# Altium PCB testpcb.PcbDoc
Units mil, origin at the board's own origin, x right, y up, seen from the top; angles counter-clockwise.
Board outline 6000 x 4000 mil, 4 copper layers (Top Layer, Layer 1, Layer 2, Bottom Layer), stack 23.756 mil thick; 151 components, 73 nets, 436 pads, 8 vias.
Unrouted connection lines stored in the file: 323.
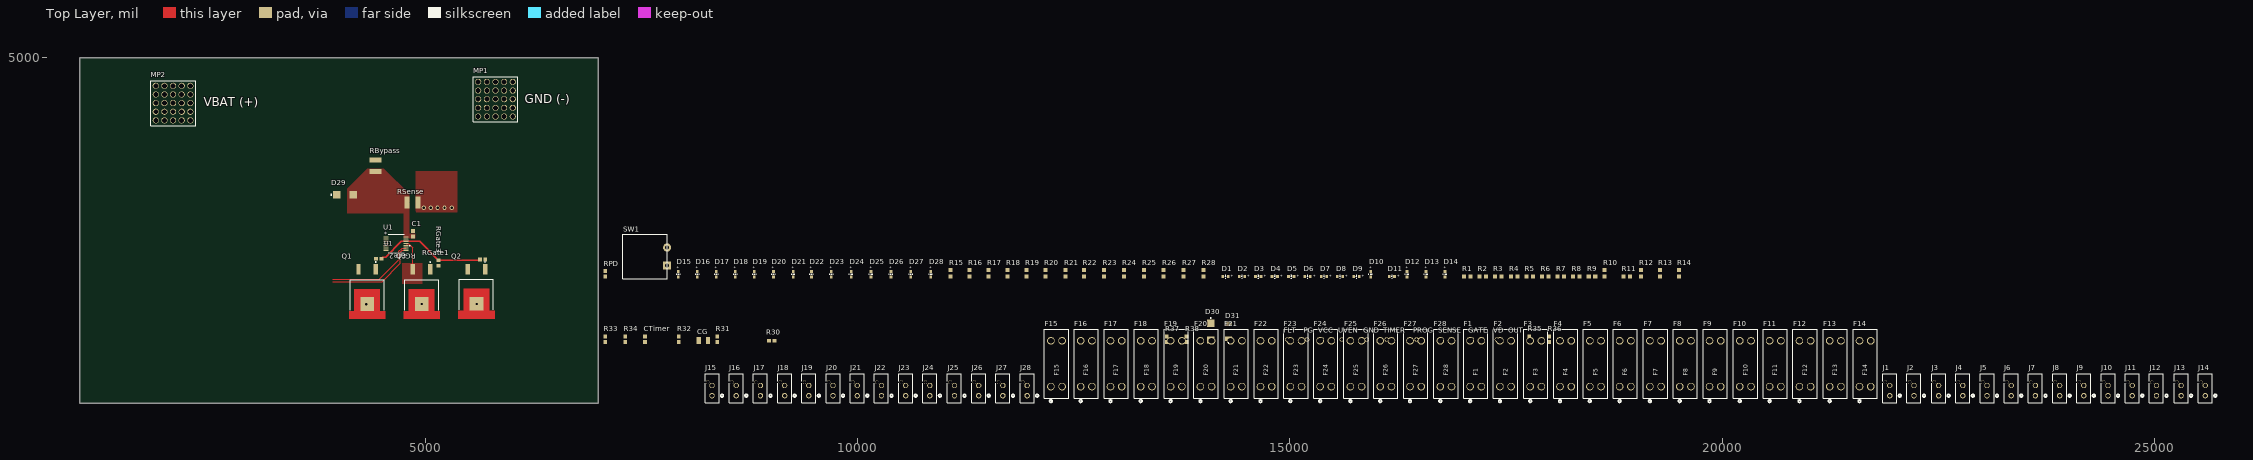
[diagram p0: Top Layer view]
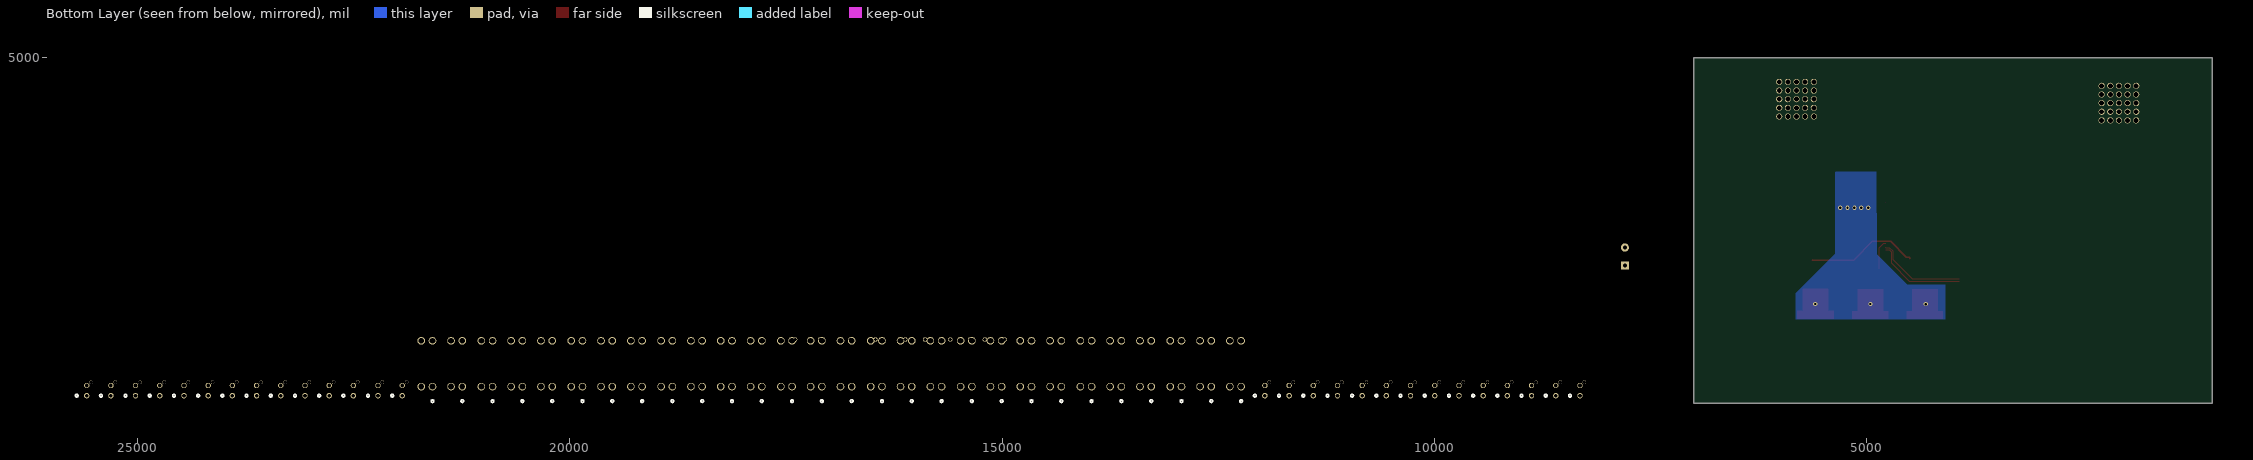
[diagram p1: Bottom Layer view, seen from below]

## Layer stack, top to bottom
Top Solder: solder mask 0.4, Solder Resist, Dk 3.5
Top Layer: signal copper 1.4
Dielectric 2: prepreg 2.8, PP-006, Dk 4.1
Layer 1: signal copper 1.378
Dielectric 1: dielectric 12.6, FR-4, Dk 4.8
Layer 2: signal copper 1.378
Dielectric 3: prepreg 2.8, PP-006, Dk 4.1
Bottom Layer: signal copper 1.4
Bottom Solder: solder mask 0.4, Solder Resist, Dk 3.5

## Board outline
1000,1000 7000,1000 7000,5000 1000,5000

## Design rules (kind name [scope] priority, off if disabled: settings)
Clearance [All] p1: gap=10 ignorepadtopadclearanceinfootprint=FALSE
PolygonConnect [All] p1: connectstyle=Direct reliefconductorwidth=10 reliefentries=4 polygonreliefangle="90 Angle" airgapwidth=10
RoutingVias [All] p1: holewidth=10 width=16 viastyle="Through Hole" minholewidth=10 minwidth=16 maxholewidth=28 maxwidth=50
SolderMaskExpansion [All] p1: expansion=4 istentingtop=FALSE
SupplyNets "Schematic Supply Nets_1" [InNet('GND')] p1: voltage=0.000
SupplyNets "Schematic Supply Nets" [InNet('VBAT')] p2: voltage=0.000
Width [All] p1: maxlimit=500 minlimit=10 preferedwidth=15 midlayer1_prefwidth=10 midlayer2_prefwidth=10 minimp=50.000000 maximp=50.000000 favimp=50.000000
30 further rules are at their usual default settings.

## Classes and differential pairs
component class "Status LEDs": D1 D2 D3 D4 D5 D6 D7 D8 D9 D10 D11 D12 D13 D14 D15 D16 D17 D18 D19 D20 D21 D22 D23 D24 D25 D26 D27 D28 R1 R2 R3 R4 R5 R6 R7 R8 R9 R10 R11 R12 R13 R14 R15 R16 R17 R18 R19 R20 R21 R22 R23 R24 R25 R26 R27 R28 RPD SW1
component class "Power Distribution": F1 F2 F3 F4 F5 F6 F7 F8 F9 F10 F11 F12 F13 F14 F15 F16 F17 F18 F19 F20 F21 F22 F23 F24 F25 F26 F27 F28 J1 J2 J3 J4 J5 J6 J7 J8 J9 J10 J11 J12 J13 J14 J15 J16 J17 J18 J19 J20 J21 J22 J23 J24 J25 J26 J27 J28 MP1 MP2
component class "Soft Start": C1 CG CTimer D29 D30 D31 FLT GATE GND OUT PG PROG Q1 Q2 Q3 R30 R31 R32 R33 R34 R35 R36 R37 R38 RBypass RGate1 RGate2 RGate3 RSense SENSE TIMER U1 UVEN VCC VD

## Components (designator, comment, footprint, x,y, rotation, side; value= is the part's Value field where it differs from the comment)
C1 "GRM1885C1H103JA01D" CAP-0603 4855,2965 r90 top
CG "CAP 1206" CAP-1206 8215,1730 r0 top
CTimer "CAP 0603" CAP-0603 7540,1745 r90 top
D1 "150060GS75000" WL-SMCW_0603 14255,2470 r0 top
D2 "150060GS75000" WL-SMCW_0603 14445,2470 r0 top
D3 "150060GS75000" WL-SMCW_0603 14635,2470 r0 top
D4 "150060GS75000" WL-SMCW_0603 14825,2470 r0 top
D5 "150060GS75000" WL-SMCW_0603 15015,2470 r0 top
D6 "150060GS75000" WL-SMCW_0603 15205,2470 r0 top
D7 "150060GS75000" WL-SMCW_0603 15395,2470 r0 top
D8 "150060GS75000" WL-SMCW_0603 15580,2470 r0 top
D9 "150060GS75000" WL-SMCW_0603 15770,2470 r0 top
D10 "150060GS75000" WL-SMCW_0603 15935,2495 r90 top
D11 "150060GS75000" WL-SMCW_0603 16180,2470 r0 top
D12 "150060GS75000" WL-SMCW_0603 16355,2495 r90 top
D13 "150060GS75000" WL-SMCW_0603 16575,2495 r90 top
D14 "150060GS75000" WL-SMCW_0603 16795,2495 r90 top
D15 "150060GS75000" WL-SMCW_0603 7925,2495 r90 top
D16 "150060GS75000" WL-SMCW_0603 8145,2495 r90 top
D17 "150060GS75000" WL-SMCW_0603 8365,2495 r90 top
D18 "150060GS75000" WL-SMCW_0603 8585,2495 r90 top
D19 "150060GS75000" WL-SMCW_0603 8805,2495 r90 top
D20 "150060GS75000" WL-SMCW_0603 9025,2495 r90 top
D21 "150060GS75000" WL-SMCW_0603 9255,2495 r90 top
D22 "150060GS75000" WL-SMCW_0603 9465,2495 r90 top
D23 "150060GS75000" WL-SMCW_0603 9695,2495 r90 top
D24 "150060GS75000" WL-SMCW_0603 9925,2495 r90 top
D25 "150060GS75000" WL-SMCW_0603 10155,2495 r90 top
D26 "150060GS75000" WL-SMCW_0603 10385,2495 r90 top
D27 "150060GS75000" WL-SMCW_0603 10615,2495 r90 top
D28 "150060GS75000" WL-SMCW_0603 10845,2495 r90 top
D29 "SMBJ40CA" "DO-214AA (SMBJ)" 4070,3415 r180 top
D30 "SMBJ40CA" "DO-214AA (SMBJ)" 14085,1830 r90 top
D31 "PMEG6030EP,115" DIO-SOD128 14290,1835 r0 top
F1 "36-3557-2-ND" CONN_3557-2_KEY 17085,1195 r90 top
F2 "36-3557-2-ND" CONN_3557-2_KEY 17430,1195 r90 top
F3 "36-3557-2-ND" CONN_3557-2_KEY 17780,1195 r90 top
F4 "36-3557-2-ND" CONN_3557-2_KEY 18125,1195 r90 top
F5 "36-3557-2-ND" CONN_3557-2_KEY 18470,1195 r90 top
F6 "36-3557-2-ND" CONN_3557-2_KEY 18815,1195 r90 top
F7 "36-3557-2-ND" CONN_3557-2_KEY 19165,1195 r90 top
F8 "36-3557-2-ND" CONN_3557-2_KEY 19510,1195 r90 top
F9 "36-3557-2-ND" CONN_3557-2_KEY 19855,1195 r90 top
F10 "36-3557-2-ND" CONN_3557-2_KEY 20205,1195 r90 top
F11 "36-3557-2-ND" CONN_3557-2_KEY 20550,1195 r90 top
F12 "36-3557-2-ND" CONN_3557-2_KEY 20895,1195 r90 top
F13 "36-3557-2-ND" CONN_3557-2_KEY 21245,1195 r90 top
F14 "36-3557-2-ND" CONN_3557-2_KEY 21590,1195 r90 top
F15 "36-3557-2-ND" CONN_3557-2_KEY 12235,1195 r90 top
F16 "36-3557-2-ND" CONN_3557-2_KEY 12580,1195 r90 top
F17 "36-3557-2-ND" CONN_3557-2_KEY 12925,1195 r90 top
F18 "36-3557-2-ND" CONN_3557-2_KEY 13275,1195 r90 top
F19 "36-3557-2-ND" CONN_3557-2_KEY 13620,1195 r90 top
F20 "36-3557-2-ND" CONN_3557-2_KEY 13965,1195 r90 top
F21 "36-3557-2-ND" CONN_3557-2_KEY 14315,1195 r90 top
F22 "36-3557-2-ND" CONN_3557-2_KEY 14660,1195 r90 top
F23 "36-3557-2-ND" CONN_3557-2_KEY 15005,1195 r90 top
F24 "36-3557-2-ND" CONN_3557-2_KEY 15350,1195 r90 top
F25 "36-3557-2-ND" CONN_3557-2_KEY 15700,1195 r90 top
F26 "36-3557-2-ND" CONN_3557-2_KEY 16045,1195 r90 top
F27 "36-3557-2-ND" CONN_3557-2_KEY 16390,1195 r90 top
F28 "36-3557-2-ND" CONN_3557-2_KEY 16740,1195 r90 top
FLT "5003" TEST-POINT-0001 14970,1740 r0 top
GATE "5003" TEST-POINT-0001 17105,1740 r90 top
GND "5003" TEST-POINT-0001 15890,1740 r0 top
J1 "CONN MF+ 2 PIN VERT" CONN_2068320000-SD_02_MOL 21940,1090 r0 top
J2 "CONN MF+ 2 PIN VERT" CONN_2068320000-SD_02_MOL 22220,1090 r0 top
J3 "CONN MF+ 2 PIN VERT" CONN_2068320000-SD_02_MOL 22505,1090 r0 top
J4 "CONN MF+ 2 PIN VERT" CONN_2068320000-SD_02_MOL 22785,1090 r0 top
J5 "CONN MF+ 2 PIN VERT" CONN_2068320000-SD_02_MOL 23065,1090 r0 top
J6 "CONN MF+ 2 PIN VERT" CONN_2068320000-SD_02_MOL 23345,1090 r0 top
J7 "CONN MF+ 2 PIN VERT" CONN_2068320000-SD_02_MOL 23625,1090 r0 top
J8 "CONN MF+ 2 PIN VERT" CONN_2068320000-SD_02_MOL 23905,1090 r0 top
J9 "CONN MF+ 2 PIN VERT" CONN_2068320000-SD_02_MOL 24185,1090 r0 top
J10 "CONN MF+ 2 PIN VERT" CONN_2068320000-SD_02_MOL 24465,1090 r0 top
J11 "CONN MF+ 2 PIN VERT" CONN_2068320000-SD_02_MOL 24745,1090 r0 top
J12 "CONN MF+ 2 PIN VERT" CONN_2068320000-SD_02_MOL 25025,1090 r0 top
J13 "CONN MF+ 2 PIN VERT" CONN_2068320000-SD_02_MOL 25310,1090 r0 top
J14 "CONN MF+ 2 PIN VERT" CONN_2068320000-SD_02_MOL 25590,1090 r0 top
J15 "CONN MF+ 2 PIN VERT" CONN_2068320000-SD_02_MOL 8315,1090 r0 top
J16 "CONN MF+ 2 PIN VERT" CONN_2068320000-SD_02_MOL 8595,1090 r0 top
J17 "CONN MF+ 2 PIN VERT" CONN_2068320000-SD_02_MOL 8875,1090 r0 top
J18 "CONN MF+ 2 PIN VERT" CONN_2068320000-SD_02_MOL 9155,1090 r0 top
J19 "CONN MF+ 2 PIN VERT" CONN_2068320000-SD_02_MOL 9435,1090 r0 top
J20 "CONN MF+ 2 PIN VERT" CONN_2068320000-SD_02_MOL 9715,1090 r0 top
J21 "CONN MF+ 2 PIN VERT" CONN_2068320000-SD_02_MOL 9995,1090 r0 top
J22 "CONN MF+ 2 PIN VERT" CONN_2068320000-SD_02_MOL 10275,1090 r0 top
J23 "CONN MF+ 2 PIN VERT" CONN_2068320000-SD_02_MOL 10555,1090 r0 top
J24 "CONN MF+ 2 PIN VERT" CONN_2068320000-SD_02_MOL 10835,1090 r0 top
J25 "CONN MF+ 2 PIN VERT" CONN_2068320000-SD_02_MOL 11120,1090 r0 top
J26 "CONN MF+ 2 PIN VERT" CONN_2068320000-SD_02_MOL 11400,1090 r0 top
J27 "CONN MF+ 2 PIN VERT" CONN_2068320000-SD_02_MOL 11680,1090 r0 top
J28 "CONN MF+ 2 PIN VERT" CONN_2068320000-SD_02_MOL 11960,1090 r0 top
MP1 "732-3278-ND" *WP-SHFU_7461098_HAL 5810,4520 r0 top
MP2 "732-3278-ND" *WP-SHFU_7461098_HAL 2080,4475 r0 top
OUT "5003" TEST-POINT-0001 17565,1740 r0 top
PG "5003" TEST-POINT-0001 15200,1740 r0 top
PROG "5003" TEST-POINT-0001 16465,1740 r90 top
Q1 "PSMN3R7-100BSEJ" TRANS_PSMN3R7-100BSEJ 4325,2300 r270 top
Q2 "PSMN3R7-100BSEJ" TRANS_PSMN3R7-100BSEJ 5590,2303.03 r270 top
Q3 "PSMN3R7-100BSEJ" TRANS_PSMN3R7-100BSEJ 4955,2300 r270 top
R1 "RA73F2A2K0BTD" RES-0805 17050,2470 r0 top
R2 "RA73F2A2K0BTD" RES-0805 17230,2470 r0 top
R3 "RA73F2A2K0BTD" RES-0805 17410,2470 r0 top
R4 "RA73F2A2K0BTD" RES-0805 17595,2470 r0 top
R5 "RA73F2A2K0BTD" RES-0805 17775,2470 r0 top
R6 "RA73F2A2K0BTD" RES-0805 17955,2470 r0 top
R7 "RA73F2A2K0BTD" RES-0805 18135,2470 r0 top
R8 "RA73F2A2K0BTD" RES-0805 18315,2470 r0 top
R9 "RA73F2A2K0BTD" RES-0805 18495,2470 r0 top
R10 "RA73F2A2K0BTD" RES-0805 18640,2505 r90 top
R11 "RA73F2A2K0BTD" RES-0805 18895,2470 r0 top
R12 "RA73F2A2K0BTD" RES-0805 19060,2505 r90 top
R13 "RA73F2A2K0BTD" RES-0805 19280,2505 r90 top
R14 "RA73F2A2K0BTD" RES-0805 19500,2505 r90 top
R15 "RA73F2A2K0BTD" RES-0805 11075,2505 r90 top
R16 "RA73F2A2K0BTD" RES-0805 11295,2505 r90 top
R17 "RA73F2A2K0BTD" RES-0805 11515,2505 r90 top
R18 "RA73F2A2K0BTD" RES-0805 11735,2505 r90 top
R19 "RA73F2A2K0BTD" RES-0805 11955,2505 r90 top
R20 "RA73F2A2K0BTD" RES-0805 12175,2505 r90 top
R21 "RA73F2A2K0BTD" RES-0805 12405,2505 r90 top
R22 "RA73F2A2K0BTD" RES-0805 12620,2505 r90 top
R23 "RA73F2A2K0BTD" RES-0805 12850,2505 r90 top
R24 "RA73F2A2K0BTD" RES-0805 13080,2505 r90 top
R25 "RA73F2A2K0BTD" RES-0805 13310,2505 r90 top
R26 "RA73F2A2K0BTD" RES-0805 13540,2505 r90 top
R27 "RA73F2A2K0BTD" RES-0805 13770,2505 r90 top
R28 "RA73F2A2K0BTD" RES-0805 14000,2505 r90 top
R30 "RES 0603" RES-0603 9005,1725 r0 top
R31 "RT0603DRD0710KL" RES-0603 8375,1745 r90 top
R32 "ERJ-3EKF4122V" RES-0603 7930,1745 r90 top
R33 "ERJ-3EKF2001V" RES-0603 7080,1745 r90 top
R34 "RES 0603" RES-0603 7310,1745 r90 top
R35 "RES 0603" RES-0603 17770,1745 r90 top
R36 "RES 0603" RES-0603 18000,1745 r90 top
R37 "RES 0603" RES-0603 13575,1745 r90 top
R38 "RES 0603" RES-0603 13805,1745 r90 top
RBypass "RES 2512" RES-2512 4420,3750 r90 top
RGate1 "CRCW060310R0FKEA" RES-0603 5660,2665 r180 top
RGate2 "CRCW060310R0FKEA" RES-0603 4460,2675 r0 top
RGate3 "CRCW060310R0FKEA" RES-0603 5150,2625 r90 top
RPD "RES 0603" RES-0603 7080,2500 r90 top
RSense "VMS-R010-1.0-U" RES-2512 4850.04,3325 r0 top
SENSE "5003" TEST-POINT-0001 16755,1740 r90 top
SW1 "GPTS203211B" BUTTON-0002 7540,2700 r0 top
TIMER "5003" TEST-POINT-0001 16120,1740 r90 top
U1 "IC-TPS2493PWR" PW14 4660,2850 r0 top
UVEN "5003" TEST-POINT-0001 15600,1740 r90 top
VCC "5003" TEST-POINT-0001 15370,1740 r0 top
VD "5003" TEST-POINT-0001 17395,1740 r0 top

## Footprints (in the part's own frame and the unit in brackets; to place one, negate y for a bottom-side part, rotate by r counter-clockwise, add the part's x,y. Pads: shape width x height; smd on the part's side, far side on the other; paste and mask are expansions set on the pad)
*WP-SHFU_7461098_HAL [mm]
  round 1.8 hole 1.45: 1(-5.08,5.08) 2(-2.54,5.08) 3(0,5.08) 4(2.54,5.08) 5(5.08,5.08) 6(5.08,2.54) 7(2.54,2.54) 8(0,2.54) 9(-2.54,2.54) 10(-5.08,2.54) 11(-5.08,0) 12(-2.54,0) 13(0,0) 14(2.54,0) 15(5.08,0) 16(5.08,-2.54) 17(2.54,-2.54) 18(0,-2.54) 19(-2.54,-2.54) 20(-5.08,-2.54) 21(-5.08,-5.08) 22(-2.54,-5.08) 23(0,-5.08) 24(2.54,-5.08) 25(5.08,-5.08)
  silkscreen extent -6.6,-6.6 6.6,6.6
BUTTON-0002 [mm]
  rect 2.4x2.4 hole 1.2: 1(6.5,-2.65)
  round 2.4 hole 1.2: 2(6.5,2.65)
  silkscreen extent -6.5,-6.5 6.5,6.5
CAP-0603 [mm]
  rect 1.15x1.1 smd: 1(-0.8,0) 2(0.8,0)
  body extent -0.8,-0.45 0.8,0.45, height 0.8
CAP-1206 [mm]
  rect 1.25x2 smd: 1(-1.375,0) 2(1.375,0)
  body extent -1.6,-0.8 1.6,0.8, height 1.5
CONN_3557-2_KEY [mil]
  round 88 hole 68 paste-99999 mask+0: 1_1(0,0) 1_2(0,-130) 2_1(530,0) 2_2(530,-130)
  silkscreen extent -182,-205 662,75
CONN_2068320000-SD_02_MOL [mil]
  round 62 / inner round 60 / far side round 62 hole 42 paste-99999 mask+0: 1(0,0) 2(0,118.11)
  round 40 / inner round 60 / far side round 40 hole 40 unplated paste-99999 mask+0: 3(-50.39,156.69)
  silkscreen extent -81,-81 131,254, body extent -76,-76 76,249, height 392
DIO-SOD128 [mm]
  rect 2x1.4 smd: 1(0,2.2) 2(0,-2.2)
  silkscreen extent -0.12,-3.55 0.13,-3.3, body extent -1.25,-2.35 1.25,2.35, height 1.05
"DO-214AA (SMBJ)" [mm]
  rect 2.16x2.26 smd: 1(-2.416,0) 2(2.484,0)
  silkscreen extent 3.94,-0.12 4.19,0.12, body extent -2.72,-1.95 2.78,1.95, height 2.45
PW14 [mil]
  rect 57.56x13.97 smd paste+0 mask+0: 1(-115,76.77) 2(-115,51.18) 3(-115,25.59) 4(-115,0) 5(-115,-25.59) 6(-115,-51.18) 7(-115,-76.77) 8(115,-76.77) 9(115,-51.18) 10(115,-25.59) 11(115,0) 12(115,25.59) 13(115,51.18) 14(115,76.77)
  silkscreen extent -94,-106 164,106, body extent -130,-101 130,101, height 47
RES-0603 [mm]
  rect 1.15x1.1 smd: 1(-0.8,0) 2(0.8,0)
  body extent -0.8,-0.4 0.8,0.4, height 0.43
RES-0805 [mm]
  rect 1.2x1.2 smd: 1(-0.95,0) 2(0.95,0)
  body extent -1,-0.6 1,0.6, height 0.71
RES-2512 [mm]
  rect 1.45x3.5 smd: 1(-1.65,0) 2(1.65,0)
TEST-POINT-0001 [mm] "2024 miniature test point"
  round 1.3 hole 1: 1(0,0)
  body extent -1.27,-1.27 1.27,1.27, height 4.57
TRANS_PSMN3R7-100BSEJ [mm]
  rect 3.1x1.3 smd paste-3: 1(-6.4,2.54) 3(-6.4,-2.54)
  rect 4x4 smd paste-3 mask+0: MB(3.8,0)
  Top Layer region: 8.15,-5.3 5.9,-5.3 5.9,-3.75 -0.55,-3.75 -0.55,3.75 5.9,3.75 5.9,5.3 8.15,5.3
  silkscreen extent -8.6,-5 5.58,5, body extent -7.65,-5 7.65,5, height 4.5
WL-SMCW_0603 [mm]
  rect 0.8x0.8 smd: 1(-0.8,0) 2(0.8,0)
  silkscreen extent -0.13,-0.5 0.11,0.5, body extent -0.84,-0.38 0.76,0.42, height 0.7

## Part data
C1: library part "CAP 0603", "10000 pF ±5% 50V Ceramic Capacitor C0G, NP0 0603 (1608 Metric)", Capacitance=0.1uF, Voltage Rating=50V
CG: "0.082 µF ±5% 50V Ceramic Capacitor C0G, NP0 1206 (3216 Metric)", Capacitance=0.082uF, Voltage Rating=50V
CTimer: "10000 pF ±5% 50V Ceramic Capacitor C0G, NP0 0603 (1608 Metric)", Capacitance=0.010uF, Voltage Rating=50V
D1 D2 D3 D4 D5 D6 D7 D8 D9 D10 D11 D12 D13 D14 D15 D16 D17 D18 D19 D20 D21 D22 D23 D24 D25 D26 D27 D28: library part LED-0002, "Green 520nm LED Indication - Discrete 3.2V 0603 (1608 Metric)", Current=20mA, Voltage=3.2V
D29 D30: library part DIO-TVS-0001, "TVS DIODE 40VWM 64.5VC DO214AA", Current Rating=9.3A, Voltage Rating=64.5V, ComponentLink1Description=Datasheet, ComponentLink1URL=https://www.littelfuse.com/media?resourcetype=datasheets&itemid=09a6ae9a-73cb-4ac4-acac-e6dab92ab953&filename=littelfuse_tvs_diode_smbj_datasheet.pdf
D31: library part DIO-SCHOTTKY-0003, "DIODE SCHOTTKY 60V 3A SOD128", Current Rating=3A, Reverse Voltage=60V, ComponentLink1Description=Datasheet, ComponentLink1URL=https://assets.nexperia.com/documents/data-sheet/PMEG6030EP.pdf
F1 F2 F3 F4 F5 F6 F7 F8 F9 F10 F11 F12 F13 F14 F15 F16 F17 F18 F19 F20 F21 F22 F23 F24 F25 F26 F27 F28: library part FUSE-0002, "Fuse Block 30 A 500V 1 Circuit Blade Through Hole / MINI ATO FUSE", Package="Nonstandard Keystone", Availability="In Stock", Check_prices=https://www.snapeda.com/parts/3557-2/Keystone+Electronics/view-part/?ref=eda, MF="Keystone Electronics", MP=3557-2, Price=None, Purchase-URL=https://pricing.snapeda.com/search/part/3557-2/?ref=eda, SnapEDA_Link=https://www.snapeda.com/parts/3557-2/Keystone+Electronics/view-part/?ref=snap
FLT GATE GND OUT PG PROG SENSE TIMER UVEN VCC VD: library part TEST-POINT-0001, "Oranange PC Test Point, Miniature Phoisphor Bronze Silver Plating Through Hole Mounting Type"
J1 J2 J3 J4 J5 J6 J7 J8 J9 J10 J11 J12 J13 J14 J15 J16 J17 J18 J19 J20 J21 J22 J23 J24 J25 J26 J27 J28: "Micro-Fit+ Vertical Header, Through Hole, 3.00mm Pitch, Dual Row, 2 Circuits, Tin (Sn) Plating, Glow-Wire Capable, Black, Tray", Manufacturer_Name="Molex Connector Corporation", Manufacturer_Part_Number=2068320201, Copyright="Copyright (C) 2025 Ultra Librarian. All rights reserved.", RefDes=RefDes, Type=Type
MP1 MP2: library part CONN-1POS-0002, "25 Pin Shank Terminal M6 Through Hole", Package=None, Availability=Unavailable, Check_prices=https://www.snapeda.com/parts/7461098/W%25C3%25BCrth+Elektronik+Midcom/view-part/?ref=eda, MF="WÃ¼rth Elektronik", MP=7461098, Price=None, SnapEDA_Link=https://www.snapeda.com/parts/7461098/W%25C3%25BCrth+Elektronik+Midcom/view-part/?ref=snap
Q1 Q2 Q3: "N-Channel 100 V 120A (Ta) 405W (Ta) Surface Mount D2PAK", Package="D2PAK-3 Nexperia USA Inc.", Check_prices=https://www.snapeda.com/parts/PSMN3R7-100BSEJ/Nexperia/view-part/?ref=eda, MF="Nexperia USA Inc.", MP=PSMN3R7-100BSEJ, SnapEDA_Link=https://www.snapeda.com/parts/PSMN3R7-100BSEJ/Nexperia/view-part/?ref=snap
R1 R2 R3 R4 R5 R6 R7 R8 R9 R10 R11 R12 R13 R14 R15 R16 R17 R18 R19 R20 R21 R22 R23 R24 R25 R26 R27 R28: library part RES-2K-0001, "2 kOhms ±0.1% 1W Chip Resistor 0805 (2012 Metric) Thin Film", Resistance=2K, Wattage="1 W"
R30: Resistance=210K, Wattage=1/10W
R31: library part "RES 0603", "10 kOhms ±0.5% 0.1W, 1/10W Chip Resistor 0603 (1608 Metric) Thin Film", Resistance=10K, Wattage=1/10W
R32: library part "RES 0603", "41.2 kOhms ±1% 0.1W, 1/10W Chip Resistor 0603 (1608 Metric) Automotive AEC-Q200 Thick Film", Resistance=41.2K, Wattage=1/10W
R33: library part "RES 0603", "4.99 kOhms ±0.1% 0.1W, 1/10W Chip Resistor 0603 (1608 Metric) Anti-Sulfur, Automotive AEC-Q200 Thin Film", Resistance=4.99K, Wattage=1/10W
R34: "1 kOhms ±0.1% 0.1W, 1/10W Chip Resistor 0603 (1608 Metric) Anti-Sulfur, Automotive AEC-Q200 Thin Film", Resistance=1K, Wattage=1/10W
R35 R36: Resistance=470k, Wattage=1/10W
R37 R38: Resistance=100k, Wattage=1/10W
RBypass: "2 mOhms ±1% 3W Chip Resistor 2512 (6332 Metric) Automotive AEC-Q200, Current Sense, Moisture Resistant Metal Element", Resistance=0.002R, Wattage=3W
RGate1 RGate2 RGate3: library part "RES 0603", "10 Ohms ±1% 0.1W, 1/10W Chip Resistor 0603 (1608 Metric) Automotive AEC-Q200 Thick Film", Resistance=10R, Wattage=1/10W
RPD: Resistance=1M, Wattage=1/10W
RSense: library part "RES 2512", "2 mOhms ±1% 3W Chip Resistor 2512 (6332 Metric) Automotive AEC-Q200, Current Sense, Moisture Resistant Metal Element", Resistance=0.002R, Wattage=3W
SW1: library part BUTTON-0002, "Pushbutton Switch SPST Standard Through Hole", Current=1A, Voltage=30V
U1: "9-V to 80-V hot swap controller with power limiting, Auto Retry and analog current monitor 14-TSSOP -40 to 125", Manufacturer_Name="Texas Instruments", Manufacturer_Part_Number=TPS2493PWR, Copyright="Copyright (C) 2026 Ultra Librarian. All rights reserved.", RefDes=RefDes, Type=Type

## Via types
v1: diameter 50, hole 28, Top Layer to Bottom Layer, 8 vias

## Nets (pads, with @x,y where several pads share a name; then routed paths per layer and width w, separated by ;. In a path a pad name is that pad's centre, name@x,y a point inside that pad or via, vN(x,y) a via of type N, cw(c..) or ccw(c..) an arc to the next point about the centre after c; other vN are vias at no path point)
GATE: CG.1 GATE.1 RGate1.2 RGate2.2 RGate3.2 U1.12 | length 1314.9
  Top Layer w15: RGate2.2 4508.15,2691.65 4538.21,2691.65 4722.15,2875.59 U1.12 4931.89,2875.59 5150,2657.48 RGate3.2 5620,2656.5 RGate1.2
GND: C1.2 CTimer.2 D29.2 D30.2 D31.1 GND.1 J1.1 J2.1 J3.1 J4.1 J5.1 J6.1 J7.1 J8.1 J9.1 J10.1 J11.1 J12.1 J13.1 J14.1 J15.1 J16.1 J17.1 J18.1 J19.1 J20.1 J21.1 J22.1 J23.1 J24.1 J25.1 J26.1 J27.1 J28.1 MP1.1 MP1.2 MP1.3 MP1.4 MP1.5 MP1.6 MP1.7 MP1.8 MP1.9 MP1.10 MP1.11 MP1.12 MP1.13 MP1.14 MP1.15 MP1.16 MP1.17 MP1.18 MP1.19 MP1.20 MP1.21 MP1.22 MP1.23 MP1.24 MP1.25 R31.2 R33.2 R34.1 R37.1 R38.1 RPD.1 SW1.1 U1.5 U1.7
NetCG_2: CG.2 R34.2
NetD1_1: D1.1 R1.2
NetD1_2: D1.2 D2.2 D3.2 D4.2 D5.2 D6.2 D7.2 D8.2 D9.2 D10.2 D11.2 D12.2 D13.2 D14.2 D15.2 D16.2 D17.2 D18.2 D19.2 D20.2 D21.2 D22.2 D23.2 D24.2 D25.2 D26.2 D27.2 D28.2 RPD.2 SW1.2
NetD2_1: D2.1 R2.2
NetD3_1: D3.1 R3.2
NetD4_1: D4.1 R4.2
NetD5_1: D5.1 R5.2
NetD6_1: D6.1 R6.2
NetD7_1: D7.1 R7.2
NetD8_1: D8.1 R8.2
NetD9_1: D9.1 R9.2
NetD10_1: D10.1 R10.2
NetD11_1: D11.1 R11.2
NetD12_1: D12.1 R12.2
NetD13_1: D13.1 R13.2
NetD14_1: D14.1 R14.2
NetD15_1: D15.1 R15.2
NetD16_1: D16.1 R16.2
NetD17_1: D17.1 R17.2
NetD18_1: D18.1 R18.2
NetD19_1: D19.1 R19.2
NetD20_1: D20.1 R20.2
NetD21_1: D21.1 R21.2
NetD22_1: D22.1 R22.2
NetD23_1: D23.1 R23.2
NetD24_1: D24.1 R24.2
NetD25_1: D25.1 R25.2
NetD26_1: D26.1 R26.2
NetD27_1: D27.1 R27.2
NetD28_1: D28.1 R28.2
NetF1_1_1: F1.1_1 F1.1_2 J1.2 R1.1
NetF2_1_1: F2.1_1 F2.1_2 J2.2 R2.1
NetF3_1_1: F3.1_1 F3.1_2 J3.2 R3.1
NetF4_1_1: F4.1_1 F4.1_2 J4.2 R4.1
NetF5_1_1: F5.1_1 F5.1_2 J5.2 R5.1
NetF6_1_1: F6.1_1 F6.1_2 J6.2 R6.1
NetF7_1_1: F7.1_1 F7.1_2 J7.2 R7.1
NetF8_1_1: F8.1_1 F8.1_2 J8.2 R8.1
NetF9_1_1: F9.1_1 F9.1_2 J9.2 R9.1
NetF10_1_1: F10.1_1 F10.1_2 J10.2 R10.1
NetF11_1_1: F11.1_1 F11.1_2 J11.2 R11.1
NetF12_1_1: F12.1_1 F12.1_2 J12.2 R12.1
NetF13_1_1: F13.1_1 F13.1_2 J13.2 R13.1
NetF14_1_1: F14.1_1 F14.1_2 J14.2 R14.1
NetF15_2_1: F15.2_1 F15.2_2 J15.2 R15.1
NetF16_2_1: F16.2_1 F16.2_2 J16.2 R16.1
NetF17_2_1: F17.2_1 F17.2_2 J17.2 R17.1
NetF18_2_1: F18.2_1 F18.2_2 J18.2 R18.1
NetF19_2_1: F19.2_1 F19.2_2 J19.2 R19.1
NetF20_2_1: F20.2_1 F20.2_2 J20.2 R20.1
NetF21_2_1: F21.2_1 F21.2_2 J21.2 R21.1
NetF22_2_1: F22.2_1 F22.2_2 J22.2 R22.1
NetF23_2_1: F23.2_1 F23.2_2 J23.2 R23.1
NetF24_2_1: F24.2_1 F24.2_2 J24.2 R24.1
NetF25_2_1: F25.2_1 F25.2_2 J25.2 R25.1
NetF26_2_1: F26.2_1 F26.2_2 J26.2 R26.1
NetF27_2_1: F27.2_1 F27.2_2 J27.2 R27.1
NetF28_2_1: F28.2_1 F28.2_2 J28.2 R28.1
NetQ1_1: Q1.1 RGate2.1
NetQ2_1: Q2.1 RGate1.1
NetQ3_1: Q3.1 RGate3.1
NetU1_6: U1.6 U1.10
PROG: PROG.1 R32.2 R33.1 U1.3
SENSE: Q1.MB Q2.MB Q3.MB RSense.2 SENSE.1 U1.13 VD.1
  other v1: 4315,2150 4955,2150.39 5595,2150.39 4980,3265 5060,3265 5140,3265 5220,3265 5305,3265
TIMER: CTimer.1 TIMER.1 U1.4
UVEN: R30.1 R31.1 U1.1 UVEN.1
VBAT: C1.1 D29.1 F21.1_1 F21.1_2 F22.1_1 F22.1_2 F23.1_1 F23.1_2 F24.1_1 F24.1_2 F25.1_1 F25.1_2 F26.1_1 F26.1_2 F27.1_1 F27.1_2 F28.1_1 F28.1_2 MP2.1 MP2.2 MP2.3 MP2.4 MP2.5 MP2.6 MP2.7 MP2.8 MP2.9 MP2.10 MP2.11 MP2.12 MP2.13 MP2.14 MP2.15 MP2.16 MP2.17 MP2.18 MP2.19 MP2.20 MP2.21 MP2.22 MP2.23 MP2.24 MP2.25 R30.2 R35.2 R36.2 RBypass.1 RSense.1 U1.14 VCC.1 | length 0.1
  Top Layer w10: RSense.1@4785.04,3324.96 RSense.1
VREF: R32.1 U1.2
VS: D30.1 D31.2 F1.2_1 F1.2_2 F2.2_1 F2.2_2 F3.2_1 F3.2_2 F4.2_1 F4.2_2 F5.2_1 F5.2_2 F6.2_1 F6.2_2 F7.2_1 F7.2_2 F8.2_1 F8.2_2 F9.2_1 F9.2_2 F10.2_1 F10.2_2 F11.2_1 F11.2_2 F12.2_1 F12.2_2 F13.2_1 F13.2_2 F14.2_1 F14.2_2 F15.1_1 F15.1_2 F16.1_1 F16.1_2 F17.1_1 F17.1_2 F18.1_1 F18.1_2 F19.1_1 F19.1_2 F20.1_1 F20.1_2 OUT.1 Q1.3 Q2.3 Q3.3 RBypass.2 U1.11 | length 349.6
  Top Layer w10: U1.11 4776.98,2848.02 4808.37,2848.02 4855,2801.39 Q3.3
~FLT: FLT.1 R35.1 R37.2 U1.9 | length 1053.3
  Top Layer w10: 3925,2440 4465,2440 4690,2665 4690,2758.28 4728.55,2796.83 4773.02,2796.83 U1.9
~PG: PG.1 R36.1 R38.2 U1.8 | length 1076.6
  Top Layer w10: 3925,2410 4500,2410 4710,2620 4710,2750 4733.23,2773.23 U1.8
pads on no net: J1.3 J2.3 J3.3 J4.3 J5.3 J6.3 J7.3 J8.3 J9.3 J10.3 J11.3 J12.3 J13.3 J14.3 J15.3 J16.3 J17.3 J18.3 J19.3 J20.3 J21.3 J22.3 J23.3 J24.3 J25.3 J26.3 J27.3 J28.3

## Polygon pours and split planes (outlines as drawn)
VBAT on Top Layer "VBAT_L01_P004" (solid, pour order 4): 4750,2965 4880,2965 4880,2910 4810,2910 4800,2920 4750,2920
VS on Top Layer "VS_L01_P003" (solid, pour order 3): 4960,2620 4960,2385 4730,2385 4730,2620 4755,2620
VBAT on Top Layer "VBAT_L01_P002" (solid, pour order 2): 4750,2915 4810,2915 4810,3425 4520,3715 4325,3715 4095,3485 4095,3200 4740,3200 4750,3190 4750,2920
SENSE on Top Layer "SENSE_L01_P000" (solid, pour order 0): 4885,3215 5370,3215 5370,3685 4890,3685
SENSE on Bottom Layer "SENSE_L04_P001" (solid, pour order 1): 4885,3680 5365,3680 5360,3675 5360,2735 5820,2275 5820,1975 4090,1975 4090,2375 4530,2375 4880,2725

## Silkscreen, mask and mechanical layers (free items; w line width, h text height)
Top Overlay:
  text "GND (-)" at 6150,4475 h100
  text "VBAT (+)" at 2435,4440 h100
  text "VBAT (+)" at -1150,4395 h100

## Text inside footprints (layer, text, board x,y; h text height)
D1: Top Overlay "+" at 14317.99,2458.19 h24; Top 3D Body "+" at 14317.99,2458.19 h24
D2: Top Overlay "+" at 14507.99,2458.19 h24; Top 3D Body "+" at 14507.99,2458.19 h24
D3: Top Overlay "+" at 14697.99,2458.19 h24; Top 3D Body "+" at 14697.99,2458.19 h24
D4: Top Overlay "+" at 14887.99,2458.19 h24; Top 3D Body "+" at 14887.99,2458.19 h24
D5: Top Overlay "+" at 15077.99,2458.19 h24; Top 3D Body "+" at 15077.99,2458.19 h24
D6: Top Overlay "+" at 15267.99,2458.19 h24; Top 3D Body "+" at 15267.99,2458.19 h24
D7: Top Overlay "+" at 15457.99,2458.19 h24; Top 3D Body "+" at 15457.99,2458.19 h24
D8: Top Overlay "+" at 15642.99,2458.19 h24; Top 3D Body "+" at 15642.99,2458.19 h24
D9: Top Overlay "+" at 15832.99,2458.19 h24; Top 3D Body "+" at 15832.99,2458.19 h24
D10: Top Overlay "+" at 15946.81,2557.99 h24 r90; Top 3D Body "+" at 15946.81,2557.99 h24 r90
D11: Top Overlay "+" at 16242.99,2458.19 h24; Top 3D Body "+" at 16242.99,2458.19 h24
D12: Top Overlay "+" at 16366.81,2557.99 h24 r90; Top 3D Body "+" at 16366.81,2557.99 h24 r90
D13: Top Overlay "+" at 16586.81,2557.99 h24 r90; Top 3D Body "+" at 16586.81,2557.99 h24 r90
D14: Top Overlay "+" at 16806.81,2557.99 h24 r90; Top 3D Body "+" at 16806.81,2557.99 h24 r90
D15: Top Overlay "+" at 7936.81,2557.99 h24 r90; Top 3D Body "+" at 7936.81,2557.99 h24 r90
D16: Top Overlay "+" at 8156.81,2557.99 h24 r90; Top 3D Body "+" at 8156.81,2557.99 h24 r90
D17: Top Overlay "+" at 8376.81,2557.99 h24 r90; Top 3D Body "+" at 8376.81,2557.99 h24 r90
D18: Top Overlay "+" at 8596.81,2557.99 h24 r90; Top 3D Body "+" at 8596.81,2557.99 h24 r90
D19: Top Overlay "+" at 8816.81,2557.99 h24 r90; Top 3D Body "+" at 8816.81,2557.99 h24 r90
D20: Top Overlay "+" at 9036.81,2557.99 h24 r90; Top 3D Body "+" at 9036.81,2557.99 h24 r90
D21: Top Overlay "+" at 9266.81,2557.99 h24 r90; Top 3D Body "+" at 9266.81,2557.99 h24 r90
D22: Top Overlay "+" at 9476.81,2557.99 h24 r90; Top 3D Body "+" at 9476.81,2557.99 h24 r90
D23: Top Overlay "+" at 9706.81,2557.99 h24 r90; Top 3D Body "+" at 9706.81,2557.99 h24 r90
D24: Top Overlay "+" at 9936.81,2557.99 h24 r90; Top 3D Body "+" at 9936.81,2557.99 h24 r90
D25: Top Overlay "+" at 10166.81,2557.99 h24 r90; Top 3D Body "+" at 10166.81,2557.99 h24 r90
D26: Top Overlay "+" at 10396.81,2557.99 h24 r90; Top 3D Body "+" at 10396.81,2557.99 h24 r90
D27: Top Overlay "+" at 10626.81,2557.99 h24 r90; Top 3D Body "+" at 10626.81,2557.99 h24 r90
D28: Top Overlay "+" at 10856.81,2557.99 h24 r90; Top 3D Body "+" at 10856.81,2557.99 h24 r90
U1: Top Overlay "*" at 4522.5,2935.74 h50; Top 3D Body "*" at 4574,2897.5 h50